# Altium PCB PCB.PcbDoc (part 4 of 4)
Units mm, origin at the board's own origin, x right, y up, seen from the top; angles counter-clockwise.
Board outline 147.57 x 62.6 mm, 4 copper layers (Top Layer, Layer 1, Layer 2, Bottom Layer), stack 1.586 mm thick; 192 components, 139 nets, 594 pads, 161 vias.
Unrouted connection lines stored in the file: 1.
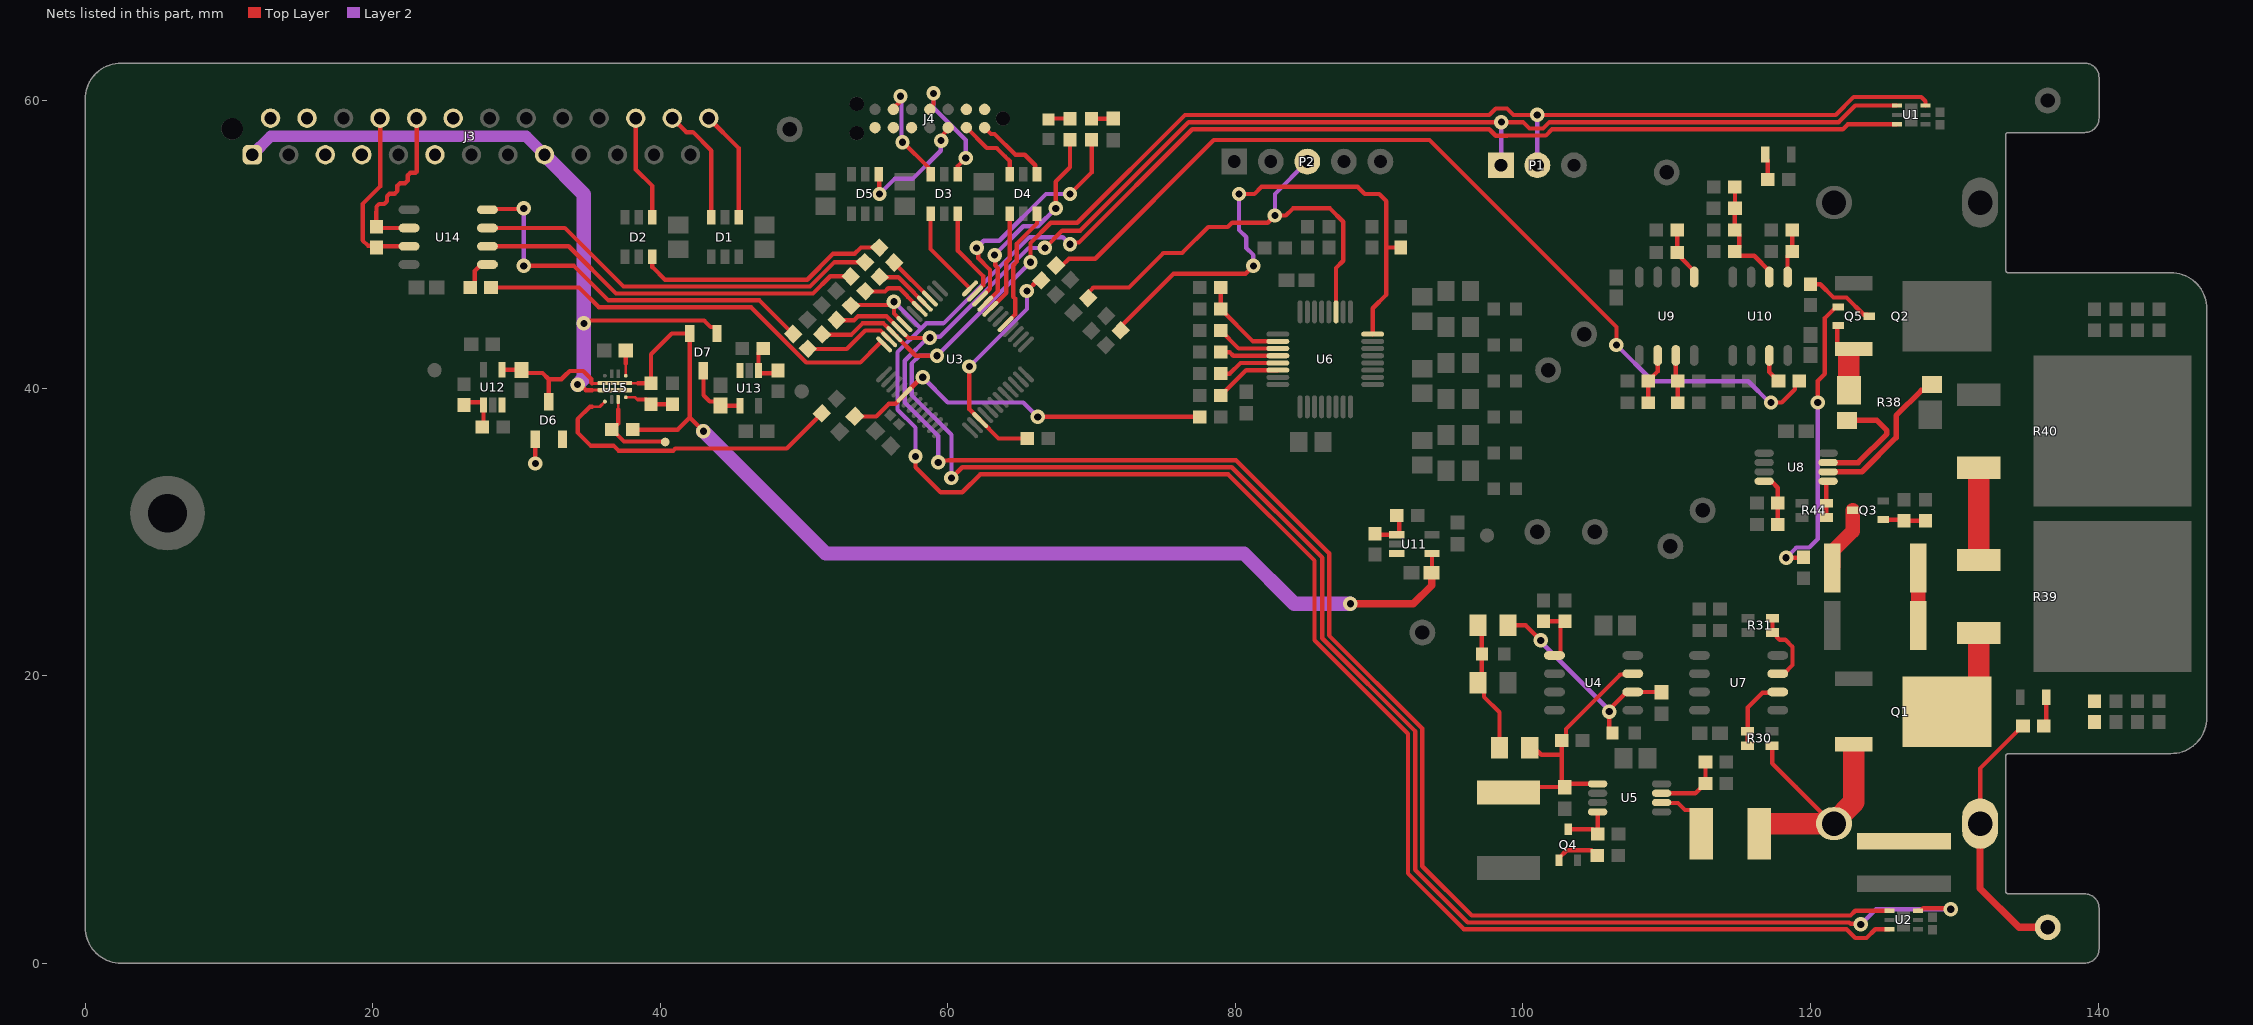
[diagram p5: the nets of this part, all layers, seen from the top]

## Via types
v1: diameter 1, hole 0.5, Top Layer to Bottom Layer, tented both sides, 153 vias
v2: diameter 0.8, hole 0.8, Top Layer to Bottom Layer, tented both sides, 8 vias

## Nets (pads, with @x,y where several pads share a name; then routed paths per layer and width w, separated by ;. In a path a pad name is that pad's centre, name@x,y a point inside that pad or via, vN(x,y) a via of type N, cw(c..) or ccw(c..) an arc to the next point about the centre after c; other vN are vias at no path point) (continued)
I2C_INT.SCL: P1.1 R83.2 U1.1 U2.1 U3.45 | length 183.4
  Top Layer w0.3: R83.2@52.263,44.737 52.28,44.72 53.47,44.72 53.75,45 55.732,45 U3.45@56.629,44.104 ; U3.45@56.643,44.09 57.247,43.485 58.735,43.485 v1(58.75,43.5) ; v1(59.331,34.831) 59.458,34.958 60.001,34.958 60.022,34.98 80.048,34.98 86.52,28.508 86.52,22.801 93,16.321 93,6.75 96.432,3.318 122.775,3.318 123.106,3.65 125.184,3.65 125.192,3.658 U2.1@125.48,3.658 ; v1(66.75,49.75) 67.95,50.95 69.2,50.95 76.75,58.5 v1(98.5,58.5) 100,58.5 100.45,58.05 101.394,58.05 101.843,58.5 121.957,58.5 123.107,59.65 U1.1@126.005,59.65
  Layer 2 w0.3: v1(59.331,34.831) 59.331,36.669 57,39 57,41.901 58.661,43.562 59.431,43.562 65.619,49.75 v1(66.75,49.75) ; P1.1@98.46,55.5 98.5,55.54 v1(98.5,58.5)
I2C_INT.SDA: P1.2 R82.2 U1.6 U2.6 U3.46 | length 196.4
  Top Layer w0.3: R82.2@51.263,43.737 51.28,43.72 53.291,43.72 54.071,44.5 55.525,44.5 55.868,44.157 U3.46@56.275,43.75 ; U3.46@56.289,43.764 56.401,43.652 56.401,43.624 57.775,42.25 v1(59.25,42.25) ; v1(60.25,33.75) 61,34.5 79.75,34.5 86.04,28.21 86.04,22.602 92.5,16.142 92.5,6.5 96.162,2.838 122.697,2.838 122.79,2.745 123.455,2.745 v1(123.5,2.7) ; v1(65.75,48.75) 65.75,50.094 67.157,51.5 69,51.5 76.5,59 97.657,59 98.106,59.45 98.894,59.45 99.343,59 v1(101,59) 121.75,59 123,60.25 127.695,60.25 127.995,59.95 U1.6@127.995,59.65 ; U2.6@127.47,3.658 127.67,3.658 127.84,3.828 129.672,3.828 v1(129.75,3.75)
  Layer 2 w0.3: v1(60.25,33.75) 60.25,36.75 57.48,39.52 57.48,41.702 58.028,42.25 v1(59.25,42.25) v1(65.75,48.75) ; P1.2@101,55.5 v1(101,59) ; v1(123.5,2.7) 124.55,3.75 v1(129.75,3.75)
I2C_INT_ALERT: R84.2 U1.3 U2.3 U3.44 | length 184.5
  Top Layer w0.3: R84.2@53.263,45.737 53.28,45.72 53.705,45.72 53.768,45.783 55.844,45.783 56.061,46 v1(56.25,46) 56.25,45.189 U3.44@56.982,44.457 ; v1(57.75,35.25) 57.75,34.5 59.5,32.75 61,32.75 62.25,34 79.5,34 85.5,28 85.5,22.464 92,15.964 92,6.25 95.892,2.358 122.498,2.358 123.106,1.75 123.894,1.75 124.502,2.358 U2.3@125.48,2.358 ; v1(68.5,50) 68.622,50.122 69.122,50.122 77,58 97.656,58 98.106,57.55 98.894,57.55 98.914,57.57 101.592,57.57 102.022,58 122.25,58 122.6,58.35 U1.3@126.005,58.35
  Layer 2 w0.3: v1(56.25,46) 58.125,44.125 ; v1(57.75,35.25) 57.75,37.25 56.5,38.5 56.5,42.5 58.125,44.125 ; v1(68.5,50) 68.496,50 67.996,50.5 65.69,50.5 59.69,44.5 58.5,44.5 58.125,44.125
IAMP_EN: R41.1 R60.2 U8.8 | length 3.7
  Top Layer w0.3: U8.8@116.775,33.525 117.254,33.525 117.354,33.425 117.375,33.425 117.725,33.075 R41.1@117.725,32 R60.2@117.725,30.5
IAMP_GAIN: R44.1 R44.2 U8.1 | length 2.6
  Top Layer w0.3: R44.1@121.1,31 R44.2@121.1,32 121.1,33.433 121.192,33.525 U8.1@121.225,33.525
IAMP_VIN_N: R38.4 U8.2 | length 10.6
  Top Layer w0.381: U8.2@121.225,34.175 121.232,34.182 123.581,34.182 125.949,36.551 125.949,38.081 127.709,39.84 128.04,39.84 R38.4@128.45,40.25
IAMP_VIN_P: R38.3 U8.3 | length 8.2
  Top Layer w0.381: U8.3@121.225,34.825 121.233,34.817 123.318,34.817 125.314,36.814 125.314,37.051 124.615,37.75 R38.3@122.55,37.75
IAMP_VREF_2V0: R42.2 R43.1 U9.5 | length 3.8
  Top Layer w0.3: R42.2@110.725,49.434 R43.1@110.725,51 ; R42.2@110.745,49.429 111.045,49.129 111.045,49.01 111.905,48.15 U9.5@111.905,47.725
IDC_EN: D1.6 J3.24 | length 8.3
  Top Layer w0.3: J3.24@40.835,58.77 41.804,57.801 42.266,57.801 43.55,56.517 D1.6@43.55,51.875
IDC_OK: D2.4 J3.22 | length 7.4
  Top Layer w0.3: J3.22@38.295,58.77 38.295,55.205 39.45,54.05 D2.4@39.45,51.875
IDC_R\S\T\: D1.4 J3.26 | length 7.8
  Top Layer w0.3: J3.26@43.375,58.77 45.45,56.695 D1.4@45.45,51.875
MCU_DAC: R55.1 R69.1 | length 64.4
  Top Layer w0.3: R69.1@67.525,48.525 67.95,48.525 68.424,49 70.25,49 78.5,57.25 93.5,57.25 106.5,44.25 v1(106.5,43) ; v1(117.25,39) 118,39 118.923,39.923 118.923,40.2 119.223,40.5 R55.1@119.225,40.5
  Layer 2 w0.3: v1(106.5,43) 109.021,40.479 115.674,40.479 117.153,39 v1(117.25,39)
MCU_DAC_OUT1: R69.2 R97.1 U3.15 | length 16.1
  Top Layer w0.3: v1(61.5,41.5) 61.5,38.525 U3.15@62.25,37.775 63.525,36.5 R97.1@65.525,36.5 ; v1(65.5,46.75) 66.25,47.5 R69.2@66.5,47.5
  Layer 2 w0.3: v1(61.5,41.5) 65.5,45.5 v1(65.5,46.75)
MCU_LED0: R93.1 U3.33 | length 14.6
  Top Layer w0.3: U3.33@62.604,45.871 63.48,46.748 63.48,48.355 63.295,48.54 63.295,49.205 v1(63.25,49.25) ; v1(67.5,52.5) 67.5,54.362 68.5,55.362 R93.1@68.5,57.275
  Layer 2 w0.3: v1(63.25,49.25) 65.25,51.25 66.25,51.25 v1(67.5,52.5)
MCU_LED1: R92.1 U3.34 | length 16.6
  Top Layer w0.3: v1(62,49.75) 62.117,49.633 62.117,49.04 62.933,48.223 62.933,46.908 U3.34@62.25,46.225 ; v1(68.5,53.5) 70,55 R92.1@70,57.275
  Layer 2 w0.3: v1(62,49.75) 62.004,49.75 62.504,50.25 63.571,50.25 66.821,53.5 v1(68.5,53.5)
MCU_RS485_CTRL.DE: R76.2 U3.40 | length 3.9
  Top Layer w0.3: R76.2@55.263,47.737 55.28,47.72 56.553,47.72 57.68,46.592 57.68,46.588 U3.40@58.396,45.871
MCU_RS485_CTRL.R\E\: R77.2 U3.41 | length 4.5
  Top Layer w0.3: R77.2@54.263,46.737 54.28,46.72 55.626,46.72 55.856,46.95 56.644,46.95 57.2,46.394 57.2,46.361 U3.41@58.043,45.518
MCU_RS485_CTRL.UART.Rx: R78.2 U3.48 | length 30.2
  Top Layer w0.3: R78.2@28.225,47 34.349,47 35.729,45.62 46.319,45.62 50.156,41.783 53.918,41.783 55.177,43.043 55.373,43.238 U3.48@55.568,43.043
MCU_RS485_CTRL.UART.Tx: R79.2 U3.47 | length 6.4
  Top Layer w0.3: R79.2@50.263,42.737 50.28,42.72 52.97,42.72 54.25,44 55.318,44 U3.47@55.921,43.397
MCU_VREF: C38.1 R12.2 U3.5 | length 26.3
  Top Layer w0.3: C38.1@53.53,38.03 53.99,38.03 54.008,38.048 54.025,38.03 55.017,38.03 55.9,38.913 56.353,38.913 58.189,40.75 v1(58.25,40.75) ; v1(66.25,38) R12.2@77.525,38
  Layer 2 w0.3: v1(58.25,40.75) 60,39 65.25,39 v1(66.25,38)
NetC5_2: C5.2 U5.2 | length 4.2
  Top Layer w0.3: U5.2@109.642,11.175 109.681,11.137 110.781,11.137 111.267,10.65 111.717,10.65 112.392,9.975 C5.2@112.392,9
NetC9_1: C9.1 R4.2 R7.1 U4.2 | length 15.8
  Top Layer w0.3: R4.2@98.542,23.5 100.185,23.5 v1(101.232,22.453) ; R7.1@106.225,16 106,16.225 106,17.648 107.217,18.865 C9.1@109.517,18.865 ; C9.1@109.632,18.853 C9.1@109.657,18.878
  Layer 2 w0.3: v1(101.232,22.453) 101.232,22.361 106,17.592 v1(106,17.5)
NetC31_1: C31.1 C32.1 D6.3 D7.2 R87.1 R88.1 U11.4 U12.4 U15.6 | length 88.7
  Top Layer w0.2: 35.25,40.344 35.284,40.31 35.75,40.31 35.8,40.36 U15.6@36.85,40.36 37.9,40.36 37.925,40.335 38.45,40.335
  Top Layer w0.3: U12.4@29,41.275 30.325,41.275 C32.1@30.35,41.25 30.55,41.05 31.815,41.05 32.25,40.615 ; D6.3@32.25,39.05 32.25,40.615 ; 33.5,41 33.115,40.615 ; 35.25,40.344 35.2,40.394 35.2,40.639 34.644,41.195 33.709,41.195 33.129,40.615 33.115,40.615 ; R88.1@38.075,37.11 41.21,37.11 42.05,37.95 ; 38.45,40.335 R87.1@39.35,40.335 39.35,42.35 40.8,43.8 D7.2@42.05,43.8 42.05,37.95 ; v1(43,37) 42.05,37.95 ; C31.1@93.65,27.15 93.675,27.175 U11.4@93.675,28.5 ; 32.25,40.615 33.115,40.615
  Top Layer w0.5: v1(88,25) 92.375,25 93.65,26.275 C31.1@93.65,27.15
  Layer 2 w1: v1(43,37) 51.5,28.5 80.6,28.5 84.1,25 v1(88,25)
NetC33_1: C33.1 D7.3 U13.4 | length 4.5
  Top Layer w0.3: D7.3@43,41.2 43,39.5 43.436,39.064 43.917,39.064 44.21,38.77 U13.4@45.535,38.77
NetC39_1: C39.1 R51.1 R54.2 R56.1 U10.6 | length 8.2
  Top Layer w0.3: R54.2@114.725,51 114.725,52.5 114.75,52.525 R56.1@114.75,54 ; R54.2@114.75,51 115.05,50.7 115.05,49.8 114.75,49.5 R51.1@114.725,49.5 115.025,49.2 116.085,49.2 117.135,48.15 U10.6@117.135,47.725
NetC41_1: C41.1 U15.7 | length 1.8
  Top Layer w0.2: U15.7@37.6,40.86 37.6,41.71
  Top Layer w0.3: 37.6,41.71 C41.1@37.6,42.61
NetD2_3: D2.3 R91.2 | length 17.8
  Top Layer w0.3: D2.3@39.45,49.125 39.45,48.415 40.325,47.54 50.219,47.54 52.019,49.34 53.519,49.34 53.959,49.78 55.22,49.78 R91.2@55.237,49.763
NetDS1_A: DS1.A R92.2 | length 1.5
  Top Layer w0.3: R92.2@70,58.725 71.475,58.725 DS1.A@71.5,58.75
NetDS2_A: DS2.A R93.2 | length 1.5
  Top Layer w0.3: DS2.A@67,58.75 68.475,58.75 R93.2@68.5,58.725
NetF2_1: F2.1 R85.2 | length 2.1
  Top Layer w0.3: R85.2@136.225,16.5 136.4,16.675 F2.1@136.4,18.5
NetF3_1: F3.1 R86.2 | length 1.8
  Top Layer w0.3: F3.1@116.85,56.25 116.85,56 117.025,55.825 R86.2@117.025,54.5
NetQ1_2: Q1.4 R39.2 | length 6.7
  Top Layer w1.5: Q1.4@129.5,17.5 130,17.5 131.7,19.2 R39.2@131.7,22.96
NetQ2_3: Q2.3 Q5.2 R38.1 | length 5
  Top Layer w0.3: Q5.2@121.925,44.35 121.85,44.275 121.85,43.07 122.45,42.47 Q2.3@122.662,42.47
  Top Layer w1.5: R38.1@122.662,39.863 Q2.3@122.662,42.47
NetQ3_1: Q3.1 R57.2 R94.1 | length 3
  Top Layer w0.3: Q3.1@125.075,30.85 126.425,30.85 R57.2@126.5,30.775 R94.1@128,30.775
NetQ3_3: Q3.3 R59.2 | length 4.6
  Top Layer w1: R59.2@121.5,27.5 121.575,27.575 121.575,28.7 122.925,30.05 Q3.3@122.925,31.5
NetQ4_1: Q4.1 R67.2 | length 3.2
  Top Layer w0.3: Q4.1@102.498,7.159 102.498,7.309 103.048,7.859 104.773,7.859 105.148,7.484 R67.2@105.173,7.484
NetQ4_3: Q4.3 R5.2 U5.8 | length 3.7
  Top Layer w0.3: Q4.3@103.148,9.309 104.859,9.309 105.167,9 R5.2@105.192,9 U5.8@105.192,10.525
NetQ5_1: Q5.1 R96.1 | length 20.8
  Top Layer w0.3: v1(118.3,28.2) 119.475,28.2 R96.1@119.5,28.225 ; v1(120.5,39) 120.5,40.5 121,41 121,44.875 121.775,45.65 Q5.1@121.925,45.65
  Layer 2 w0.3: v1(118.3,28.2) 119.017,28.917 119.917,28.917 120.5,29.5 v1(120.5,39)
NetQ5_3: Q5.3 R95.2 | length 5
  Top Layer w0.3: R95.2@120,47.225 120.675,47.225 121.6,46.3 122.5,46.3 123.7,45.1 123.975,45.1 Q5.3@124.075,45
NetR1_2: R1.2 R2.2 R3.1 R4.1 | length 9.2
  Top Layer w0.3: R1.2@96.867,19.5 97.142,19.775 R2.2@97.142,21.5 97.142,23.225 R4.1@96.867,23.5 ; R1.2@97.292,19.5 97.292,18.525 98.367,17.45 R3.1@98.367,15
NetR6_2: R6.2 R8.1 U5.3 | length 4.8
  Top Layer w0.3: U5.3@109.642,11.825 111.992,11.825 112.667,12.5 R6.2@112.692,12.5 R8.1@112.692,14
NetR9_2: R9.2 R10.1 U4.5 | length 4.3
  Top Layer w0.3: R10.1@101.417,23.775 R9.2@102.917,23.775 102.617,23.475 102.617,21.544 102.479,21.405 U4.5@102.192,21.405
NetR15_1: R15.1 R21.2 U6.8 | length 38.2
  Top Layer w0.3: R21.2@72.013,44.013 72.013,44.263 75.7,47.95 80.7,47.95 v1(81.25,48.5) ; v1(80.25,53.5) 81.321,53.5 81.821,54 88.5,54 89,53.5 90,53.5 90.5,53 90.5,49.775 ; U6.8@89.55,43.75 89.55,45.55 90.5,46.5 90.5,49.775 ; R15.1@91.5,49.775 90.5,49.775
  Layer 2 w0.3: v1(80.25,53.5) 80.25,51 80.75,50.5 80.75,49.75 81.25,49.25 v1(81.25,48.5)
NetR26_1: R26.1 U6.22 | length 4.7
  Top Layer w0.3: R26.1@78.975,39.5 79,39.5 80.75,41.25 U6.22@82.95,41.25
NetR27_1: R27.1 U6.21 | length 4.3
  Top Layer w0.3: R27.1@78.975,41 79.6,41 80.35,41.75 U6.21@82.95,41.75
NetR28_1: R28.1 U6.20 | length 4.1
  Top Layer w0.3: R28.1@78.975,42.5 79.6,42.5 79.85,42.25 U6.20@82.95,42.25
NetR29_1: R29.1 U6.19 | length 4.5
  Top Layer w0.3: R29.1@78.975,44 80.225,42.75 U6.19@82.95,42.75
NetR30_1: R30.1 R30.2 U7.2 | length 5.2
  Top Layer w0.3: R30.2@115.631,15.134 R30.1@115.631,16.134 115.631,17.784 116.655,18.808 117.668,18.808 U7.2@117.725,18.865
NetR31_1: R31.1 R31.2 U7.3 | length 5.4
  Top Layer w0.3: R31.2@117.35,24 R31.1@117.35,23 117.5,23 117.65,22.85 117.65,22.7 117.85,22.5 118.25,22.5 118.75,22 118.75,20.735 118.15,20.135 U7.3@117.725,20.135
NetR39_1: R39.1 R40.2 | length 6.4
  Top Layer w1.5: R39.1@131.7,28.04 R40.2@131.7,34.46
NetR45_1: R45.1 R46.2 U9.2 | length 3.6
  Top Layer w0.3: R46.2@108.72,38.979 R45.1@108.72,40.479 108.72,40.504 109.365,41.149 U9.2@109.365,42.275
NetR47_2: R47.2 R48.2 U9.3 | length 3.4
  Top Layer w0.3: U9.3@110.635,42.275 110.635,40.614 R48.2@110.77,40.479 110.77,39.119 R47.2@110.77,38.979
NetR52_1: R52.1 R53.2 U10.5 | length 3.4
  Top Layer w0.3: U10.5@118.405,47.725 118.405,49.2 118.705,49.5 R52.1@118.725,49.5 R53.2@118.725,51
NetR55_2: R55.2 U10.3 | length 2.1
  Top Layer w0.3: U10.3@117.135,42.275 117.135,41.115 117.75,40.5 R55.2@117.775,40.5
NetR58_2: R58.2 R59.1 | length 4
  Top Layer w1: R58.2@127.5,23.5 R59.1@127.5,27.5
NetR70_2: R70.2 R71.1 U11.1 | length 3.5
  Top Layer w0.3: R71.1@89.7,30.125 89.983,29.842 89.983,29.817 90,29.8 91.306,29.8 91.406,29.9 R70.2@91.406,30.969 ; R70.2@91.406,30.969 R70.2@91.225,31.15 R70.2@91.406,30.969
NetR72_2: R72.2 R73.1 U12.1 | length 3.5
  Top Layer w0.3: R73.1@27.375,37.3 27.658,37.583 27.683,37.583 27.7,37.6 27.7,38.906 27.6,39.006 R72.2@26.531,39.006 ; R72.2@26.531,39.006 R72.2@26.35,38.825 R72.2@26.531,39.006
NetR74_2: R74.2 R75.1 U13.1 | length 3.5
  Top Layer w0.3: R75.1@47.16,42.745 46.878,42.463 46.853,42.463 46.835,42.445 46.835,41.14 46.935,41.04 R74.2@48.005,41.04 ; R74.2@48.005,41.04 R74.2@48.185,41.22 R74.2@48.005,41.04
NetR87_2: R87.2 R89.1 U15.4 | length 3.5
  Top Layer w0.2: U15.4@37.6,39.36 38.25,39.36 38.4,39.21 38.45,39.21
  Top Layer w0.3: 38.45,39.21 39.05,39.21 39.35,38.91 R87.2@39.35,38.885 R89.1@40.85,38.885
NetR88_2: R88.2 TP15.1 U15.3 | length 6.3
  Top Layer w0.2: 37.075,38.51 U15.3@37.075,39.21
  Top Layer w0.3: 37.075,38.51 37.075,37.535 36.65,37.11 37.48,36.28 40.314,36.28 TP15.1@40.344,36.25
NetR90_2: R90.2 U15.1 | length 21.9
  Top Layer w0.2: 35.25,38.7 35.79,38.7 U15.1@36.15,39.06
  Top Layer w0.3: 35.25,38.7 35.106,38.7 34.25,37.844 34.25,36.907 35.157,36 36.75,36 37.1,35.65 40.9,35.65 41.05,35.8 48.8,35.8 R90.2@51.237,38.237
NetU11_3: U11.3
NetU12_3: U12.3
NetU13_3: U13.3
OK: R91.1 U3.39 | length 3.5
  Top Layer w0.3: R91.1@56.263,48.737 56.263,48.712 U3.39@58.75,46.225
R\S\T\_TERM: R13.2 R22.2 U6.18 | length 6.4
  Top Layer w0.3: R13.2@78.975,47 R22.2@78.975,45.5 81.225,43.25 U6.18@82.95,43.25
RS485_DE: R76.1 U14.3 | length 28.7
  Top Layer w0.3: U14.3@27.975,51.135 33.365,51.135 37.44,47.06 50.418,47.06 52.12,48.763 53.778,48.763 53.795,48.78 54.22,48.78 R76.1@54.237,48.763
RS485_DI: R79.1 U14.4 | length 27.3
  Top Layer w0.3: U14.4@27.975,52.405 28.022,52.453 30.453,52.453 v1(30.5,52.5) ; v1(30.5,48.5) 34,48.5 36.4,46.1 46.9,46.1 R79.1@49.237,43.763
  Layer 2 w0.3: v1(30.5,48.5) v1(30.5,52.5)
RS485_MCU.A: J3.10 R80.2 U14.6 | length 11.8
  Top Layer w0.3: U14.6@22.525,51.135 20.34,51.135 R80.2@20.25,51.225 20.25,51.7 20.25,52.25 20.268,52.268 20.268,52.621 20.444,52.798 20.798,52.798 20.992,52.992 20.992,53.346 21.169,53.523 21.523,53.523 21.717,53.717 21.717,54.071 21.894,54.248 22.248,54.248 22.442,54.442 22.442,54.796 22.619,54.972 22.972,54.972 23.055,55.055 23.055,55.264 J3.10@23.055,58.77
RS485_MCU.B: J3.8 R80.1 U14.7 | length 12.5
  Top Layer w0.3: J3.8@20.515,58.77 20.515,54.015 19.3,52.8 19.3,50.275 19.667,49.908 20.117,49.908 R80.1@20.25,49.775 20.34,49.865 U14.7@22.525,49.865
RS485_R\E\: R77.1 U14.2 | length 27.1
  Top Layer w0.3: U14.2@27.975,49.865 33.635,49.865 36.92,46.58 50.616,46.58 51.817,47.78 53.22,47.78 R77.1@53.237,47.763
RS485_RO: R78.1 U14.1 | length 2.4
  Top Layer w0.3: R78.1@26.775,47 26.8,47 27.1,47.3 27.1,48.145 27.55,48.595 U14.1@27.975,48.595
RS485_SPARE_1: R81.1
RS485_SPARE_2: R81.2
SCLK_TERM: P2.3 R18.2 U6.11 | length 32.1
  Top Layer w0.3: R18.2@69.763,46.263 69.763,46.642 70.121,47 72.6,47 74.99,49.39 76.296,49.39 78.106,51.2 79.472,51.2 79.772,51.5 82.246,51.5 82.746,52 83.5,52 84,52.5 86.574,52.5 87.5,51.574 87.5,48.858 87,48.358 U6.11@87,45.3
  Layer 2 w0.3: v1(82.75,52) 82.75,53.5 P2.3@85,55.75
SWD.SWCLK: D3.4 U3.36 | length 6.3
  Top Layer w0.3: D3.4@58.8,52.125 58.8,49.675 U3.36@61.543,46.932
SWD.SWDIO: D3.6 U3.35 | length 6.5
  Top Layer w0.3: D3.6@60.7,52.125 60.7,49.55 62.453,47.797 62.453,47.135 U3.35@61.897,46.579
SWD_NC1: J4.1
SWD_NC2: J4.2
SWD_NC3: J4.9
SWD_NC4: J4.10
SWD_NRST_CONN: D5.1 J4.12 | length 8.7
  Top Layer w0.3: D5.1@55.2,54.875 55.225,54.85 55.225,53.525 v1(55.25,53.5) ; v1(59.533,57.212) 59.667,57.346 59.667,57.629 60.02,57.982 J4.12@60.02,58.115
  Layer 2 w0.3: v1(55.25,53.5) 56.3,54.55 57.55,54.55 59.502,56.502 59.502,57.181 v1(59.533,57.212)
SWD_SWCLK_CONN: D3.3 J4.6 | length 7.4
  Top Layer w0.3: J4.6@56.21,59.385 56.21,59.453 56.575,59.819 56.575,60.164 v1(56.709,60.298) ; v1(56.843,57.101) 56.892,57.101 58.65,55.344 58.65,55.025 D3.3@58.8,54.875
  Layer 2 w0.3: v1(56.709,60.298) 56.776,60.231 56.776,57.168 v1(56.843,57.101)
SWD_SWDIO_CONN: D3.1 J4.4 | length 8
  Top Layer w0.3: J4.4@58.75,59.385 58.75,59.497 59,59.747 v1(59,60.5) ; D3.1@60.7,54.875 60.7,55.45 v1(61.25,56)
  Layer 2 w0.3: v1(59,60.5) 59,59.5 61.25,57.25 v1(61.25,56)
SWD_SWO: J4.8
SWD_UART.Rx: D4.4 U3.32 | length 7.2
  Top Layer w0.3: U3.32@62.957,45.518 64.07,46.631 64.07,48.749 64.3,48.979 D4.4@64.3,52.125
SWD_UART.Tx: D4.6 U3.29 | length 8.7
  Top Layer w0.3: U3.29@64.018,44.457 64.679,45.118 64.679,46.227 64.55,46.356 64.55,48.55 64.8,48.8 64.8,50.05 66.2,51.45 D4.6@66.2,52.125
SWD_UART_RX_CONN: D4.1 J4.14 | length 5.3
  Top Layer w0.3: J4.14@62.56,58.115 62.997,57.678 63.247,57.678 64.7,56.225 65.35,56.225 66.073,55.502 66.073,55.002 D4.1@66.2,54.875
SWD_UART_TX_CONN: D4.3 J4.13 | length 4.9
  Top Layer w0.3: J4.13@61.29,58.115 62.705,56.7 63.393,56.7 63.95,56.143 64.3,55.793 D4.3@64.3,54.875
VAUX: D7.1 J3.1 J3.17 U15.5 | length 51.3
  Top Layer w0.2: 35.25,39.86 U15.5@36.85,39.86
  Top Layer w0.3: v1(34.25,40.245) 34.439,40.245 34.825,39.86 35.25,39.86 ; v1(34.685,44.5) 34.875,44.5 35.075,44.7 43.05,44.7 43.5,44.25 43.775,44.25 43.95,44.075 D7.1@43.95,43.8
  Layer 2 w0.8: J3.1@11.625,56.23 12.895,57.5 30.675,57.5 J3.17@31.945,56.23
  Layer 2 w1: J3.17@31.945,56.23 34.685,53.49 v1(34.685,44.5) 34.685,40.681 v1(34.25,40.245)
VBATT: C5.1 J1.1A J1.1B Q1.3 R30.3 R85.1 RT1.2 TP13.1 | length 37
  Top Layer w0.3: R30.3@117.331,15.134 117.331,13.907 119,12.237 121.535,9.703 J1.1B@121.635,9.703 ; J1.1A@131.795,9.703 131.795,13.545 134.75,16.5 R85.1@134.775,16.5
  Top Layer w0.5: J1.1A@131.795,9.703 131.795,5.205 134.5,2.5 TP13.1@136.5,2.5
  Top Layer w1.5: C5.1@116.442,9 116.442,9.703 J1.1B@121.535,9.703 ; J1.1B@121.635,9.703 121.635,9.819 123,11.184 123,14.72
VBUS: D6.1 J3.2 J3.4 J3.5 J3.7 J3.11 J3.12 | length 1.7
  Top Layer w0.3: D6.1@31.3,36.45 31.307,36.443 31.307,34.762 v1(31.315,34.755)
VREG: D6.2
VRMS_DC: C7.1 C8.1 R3.2 R11.1 U4.3 U5.5 | length 19.6
  Top Layer w0.3: C7.1@99,11.875 99.375,12.25 C8.1@102.917,12.25 ; R3.2@100.042,15 100.767,15 R3.2@100.792,14.975 ; R3.2@100.792,15 R3.2@100.792,14.975 ; 102.5,14.5 101.267,14.5 R3.2@100.792,14.975 ; U5.5@105.192,12.475 103.142,12.475 C8.1@102.917,12.25 ; U4.3@107.642,20.135 107.585,20.078 106.774,20.078 102.987,16.291 102.987,15.795 R11.1@102.692,15.5 102.692,12.475 C8.1@102.917,12.25
pads on no net: D2.1 D2.6 D5.3 D5.4 J3.16 J3.18 J3.19 J3.21 J3.23 J3.MH1 J4.MH0 J4.MH1 J4.MH2 R36.1 R36.2 R37.1 R37.2 R39.3 R40.3 R61.1 R61.2 R62.1 R62.2 R64.1 R64.2 R65.1 R65.2 R68.1 R68.2 U3.2 U3.3 U3.8 U3.9 U3.11 U3.13 U3.14 U3.16 U3.17 U3.18 U3.19 U3.20 U3.28 U3.30 U3.31 U3.37 U3.42 U3.43 U15.10

## Polygon pours and split planes (outlines as drawn)
VBATT on Top Layer "NONET_L-01_P-001" (solid, pour order 20): 121.711,7.9 120.722,8.889 120.722,10.516 121.658,11.453 131.795,11.453 132.679,10.569 132.679,8.319 132.26,7.9
GND on Top Layer "Top Layer-GND 1" (solid, pour order 21): 121.535,51.75 131.662,51.75 132.679,52.767 132.679,54.284 129.963,57 129.06,57 128.345,57.715 128.345,58.5 127.645,58.5 127.445,58.7 127.445,59.8 126.555,59.8 126.555,58.1 125.455,57 124.008,57 120.722,53.714 120.722,52.564
GND on Top Layer "Top Layer-GND" (solid, pour order 22): 124.83,4.108 125.875,4.108 126.03,3.953 126.03,2.208 126.92,2.208 126.92,3.953 127.367,4.4 129.192,4.4 129.75,4.958 129.75,6.108 123.2,6.108 123.2,4.958 124.05,4.108
GND on Layer 2 "L2 GND" (solid, remove dead copper, pour order 25): 2.498,0.002 cw(c2.498,2.502) -0.002,2.502 -0.002,60.102 cw(c2.498,60.102) 2.498,62.602 139.067,62.602 cw(c139.067,61.602) 140.067,61.602 140.067,58.776 cw(c139.067,58.776) 139.067,57.776 133.767,57.776 ccw(c133.767,57.576) 133.567,57.576 133.567,48.225 ccw(c133.767,48.225) 133.767,48.025 145.067,48.025 cw(c145.067,45.525) 147.567,45.525 147.567,17.078 cw(c145.067,17.078) 145.067,14.578 133.767,14.578 ccw(c133.767,14.378) 133.567,14.378 133.567,5.027 ccw(c133.767,5.027) 133.767,4.827 139.067,4.827 cw(c139.067,3.827) 140.067,3.827 140.067,1.002 cw(c139.067,1.002) 139.067,0.002
3V3 on Layer 2 "3V3 Plane" (solid, remove dead copper, pour order 23): 45,36 45,42.503 49,46.503 49,62.602 88.5,62.602 88.5,48 71.5,31 50.333,31
5V0A on Layer 2 "5V0A Plane" (solid, remove dead copper, pour order 24): 81,35 81,29.323 95.5,14.823 95.5,5 120,5 121.635,6.635 121.635,9.703 123,11.068 123,30.65 123,44.5 114.5,53 99,53
no net on Top Solder "VRMS GUARD" (none): 108.717,20.4 108.717,19.9 108.317,19.5 106.917,19.5 106.748,19.5 103.417,16.17 103.417,14.917 103.2,14.7 103.2,13.2 103.35,13.05 105.867,13.05 106.217,12.7 106.217,12.175 105.921,11.879 105.246,11.879 105.192,11.825 103.967,11.825 102.917,10.775 102.917,10.75 102.067,10.75 101.817,10.5 97,10.5 96.25,11.25 96.25,12.65 96.3,12.7 96.865,13.242 98.66,13.242 98.752,13.242 99.527,14.018 99.527,15.91 99.917,16.3 102.317,16.3 106.817,20.8 108.317,20.8
VBATT on Bottom Layer "L2 GND" (solid, remove dead copper, pour order 26): 139.067,0.002 70.152,0.002 70.152,62.602 139.067,62.602 cw(c139.067,61.602) 140.067,61.602 140.067,58.776 cw(c139.067,58.776) 139.067,57.776 133.767,57.776 ccw(c133.767,57.576) 133.567,57.576 133.567,48.225 ccw(c133.767,48.225) 133.767,48.025 145.067,48.025 cw(c145.067,45.525) 147.567,45.525 147.567,17.078 cw(c145.067,17.078) 145.067,14.578 133.767,14.578 ccw(c133.767,14.378) 133.567,14.378 133.567,5.027 ccw(c133.767,5.027) 133.767,4.827 139.067,4.827 cw(c139.067,3.827) 140.067,3.827 140.067,1.002 cw(c139.067,1.002)
VBUS on Bottom Layer "L2 GND" (solid, remove dead copper, pour order 27): 2.498,0.002 69.848,0.002 69.848,62.602 2.498,62.602 ccw(c2.498,60.102) -0.002,60.102 -0.002,2.502 ccw(c2.498,2.502)
GND on Layer 1 (split plane): 173 vertices, not listed, extent 0.499,0.502 147.066,62.101

## Silkscreen, mask and mechanical layers (free items; w line width, h text height)
Top Overlay:
  circle w0.2: c132,3 r1.414
  circle w0.2: c132,59 r1.414
  lines w0.25: 131,3 133,3 ; 132,2 132,4 ; 132,58 132,60 ; 111,1 111,5 122,5 122,1 111,1
  text "G" at 132.253,61.961 h4 r270
  text "MOSI" at 80.465,57.656 h2 r90
  text "MISO" at 83.005,57.656 h2 r90
  text "SCLK" at 85.545,57.655 h2 r90
  text "CS" at 88.085,57.655 h2 r90
  text "GND" at 90.625,57.655 h2 r90
  text "SCL" at 99.045,57.405 h2 r90
  text "SDA" at 101.545,57.405 h2 r90
  text "GND" at 104.085,57.405 h2 r90
  text "G" at 104.693,56.2 h5 r270
  text "5V0D" at 19.227,40.455 h2
  text "3V3" at 50.145,36.12 h2 r90
  text "PG" at 41.175,35.705 h2
  text "e" at 123.779,32.749 h5
  text "5V0A" at 94.951,27.205 h2
  text "G" at 91.8,17.693 h5
  text "a" at 122.129,15.605 h2.5
  text "a" at 133.004,14.884 h2
  text "e" at 91.467,12.048 h8
  text "a" at 131.129,11.355 h2.5
  text "a" at 116.129,10.855 h2.5
  text "a" at 120.129,5.855 h2.5
  text "DO NOT" at 114.58,3.318 h2.5
  text "SHORT" at 115.168,1.318 h2.5
  text "A" at 111.261,0.961 h5
  text "a" at 137.554,0.584 h2
Bottom Overlay:
  drawing of 326 lines, arcs and shapes, not listed
  text "a" at 131.129,11.355 h2.5
  text "SISPS-BATT-INT-PCB" at 55.251,7.5 h6
  text "a" at 120.129,5.855 h2.5
  text "LD STANTON" at 18.628,5.022 h3
  text "DO NOT" at 118.42,3.318 h2.5
  text "SEPTEMBER 2025" at 24.365,2.522 h3
  text "'.Project_Revision'" at 55,2.522 h3
  text "SHORT" at 117.832,1.318 h2.5
  text "A" at 121.739,0.961 h5
  text "a" at 137.554,0.584 h2
Mechanical 1:
  the board outline again, w0.2
Drill Drawing:
  lines w0.381: 9.816,74.51 20.228,74.51 54,74.51 68.221,74.51 84.726,74.51 99.201,74.51 ; 9.816,77.558 20.228,77.558 54,77.558 68.221,77.558 84.726,77.558 99.201,77.558 ; 9.816,80.606 20.228,80.606 54,80.606 68.221,80.606 84.726,80.606 99.201,80.606 ; 9.816,83.654 20.228,83.654 54,83.654 68.221,83.654 84.726,83.654 99.201,83.654 ; 9.816,86.702 20.228,86.702 54,86.702 68.221,86.702 84.726,86.702 99.201,86.702 ; 9.816,89.75 20.228,89.75 54,89.75 68.221,89.75 84.726,89.75 99.201,89.75 ; 9.816,92.798 20.228,92.798 54,92.798 68.221,92.798 84.726,92.798 99.201,92.798 ; 9.816,95.846 20.228,95.846 54,95.846 68.221,95.846 84.726,95.846 99.201,95.846 ; 9.816,98.894 20.228,98.894 54,98.894 68.221,98.894 84.726,98.894 99.201,98.894 ; 9.816,101.942 20.228,101.942 54,101.942 68.221,101.942 84.726,101.942 99.201,101.942 ; 9.816,104.99 20.228,104.99 54,104.99 68.221,104.99 84.726,104.99 99.201,104.99 ; 9.816,108.038 20.228,108.038 54,108.038 68.221,108.038 84.726,108.038 99.201,108.038 ; 9.816,111.086 99.201,111.086 ; 20.228,114.134 20.228,71.462 ; 54,114.134 54,71.462 ; 68.221,114.134 68.221,71.462 ; 84.726,114.134 84.726,71.462 ; 20.228,71.462 54,71.462 ; 20.228,71.462 9.816,71.462 9.816,114.134 99.201,114.134 99.201,71.462 84.726,71.462 ; 54,71.462 68.221,71.462 ; 68.221,71.462 84.726,71.462
  text "Layer" at 11.594,111.848 h1.52
  text "Name" at 22.006,111.848 h1.52
  text "Material" at 55.778,111.848 h1.52
  text "Thickness" at 69.999,111.848 h1.52
  text "Constant" at 86.504,111.848 h1.52
  text "Top Overlay" at 22.006,108.8 h1.52
  text "Top Solder" at 22.006,105.752 h1.52
  text "SM-002" at 55.778,105.752 h1.52
  text "0,51mil" at 69.999,105.752 h1.52
  text "3.8" at 86.504,105.752 h1.52
  text "Top Surface Finish" at 22.006,102.704 h1.52
  text "ENIG" at 55.778,102.704 h1.52
  text "0,16mil" at 69.999,102.704 h1.52
  text "1" at 11.594,99.656 h1.52
  text "Top Layer" at 22.006,99.656 h1.52
  text "CF-005" at 55.778,99.656 h1.52
  text "1,38mil" at 69.999,99.656 h1.52
  text "PP1" at 22.006,96.608 h1.52
  text "PP-022" at 55.778,96.608 h1.52
  text "8,28mil" at 69.999,96.608 h1.52
  text "4.6" at 86.504,96.608 h1.52
  text "2" at 11.594,93.56 h1.52
  text "Layer 1" at 22.006,93.56 h1.52
  text "CF-004" at 55.778,93.56 h1.52
  text "0,60mil" at 69.999,93.56 h1.52
  text "Core" at 22.006,90.512 h1.52
  text "FR-4" at 55.778,90.512 h1.52
  text "41,93mil" at 69.999,90.512 h1.52
  text "4.3" at 86.504,90.512 h1.52
  text "3" at 11.594,87.464 h1.52
  text "Layer 2" at 22.006,87.464 h1.52
  text "CF-004" at 55.778,87.464 h1.52
  text "0,60mil" at 69.999,87.464 h1.52
  text "PP2" at 22.006,84.416 h1.52
  text "PP-022" at 55.778,84.416 h1.52
  text "8,28mil" at 69.999,84.416 h1.52
  text "4.6" at 86.504,84.416 h1.52
  text "4" at 11.594,81.368 h1.52
  text "Bottom Layer" at 22.006,81.368 h1.52
  text "CF-005" at 55.778,81.368 h1.52
  text "1,38mil" at 69.999,81.368 h1.52
  text "Bottom Surface Finish" at 22.006,78.32 h1.52
  text "ENIG" at 55.778,78.32 h1.52
  text "0,16mil" at 69.999,78.32 h1.52
  text "Bottom Solder" at 22.006,75.272 h1.52
  text "SM-002" at 55.778,75.272 h1.52
  text "0,51mil" at 69.999,75.272 h1.52
  text "3.8" at 86.504,75.272 h1.52
  text "Bottom Overlay" at 22.006,72.224 h1.52